# Allegro board BeagleBone_Black_RevC.brd
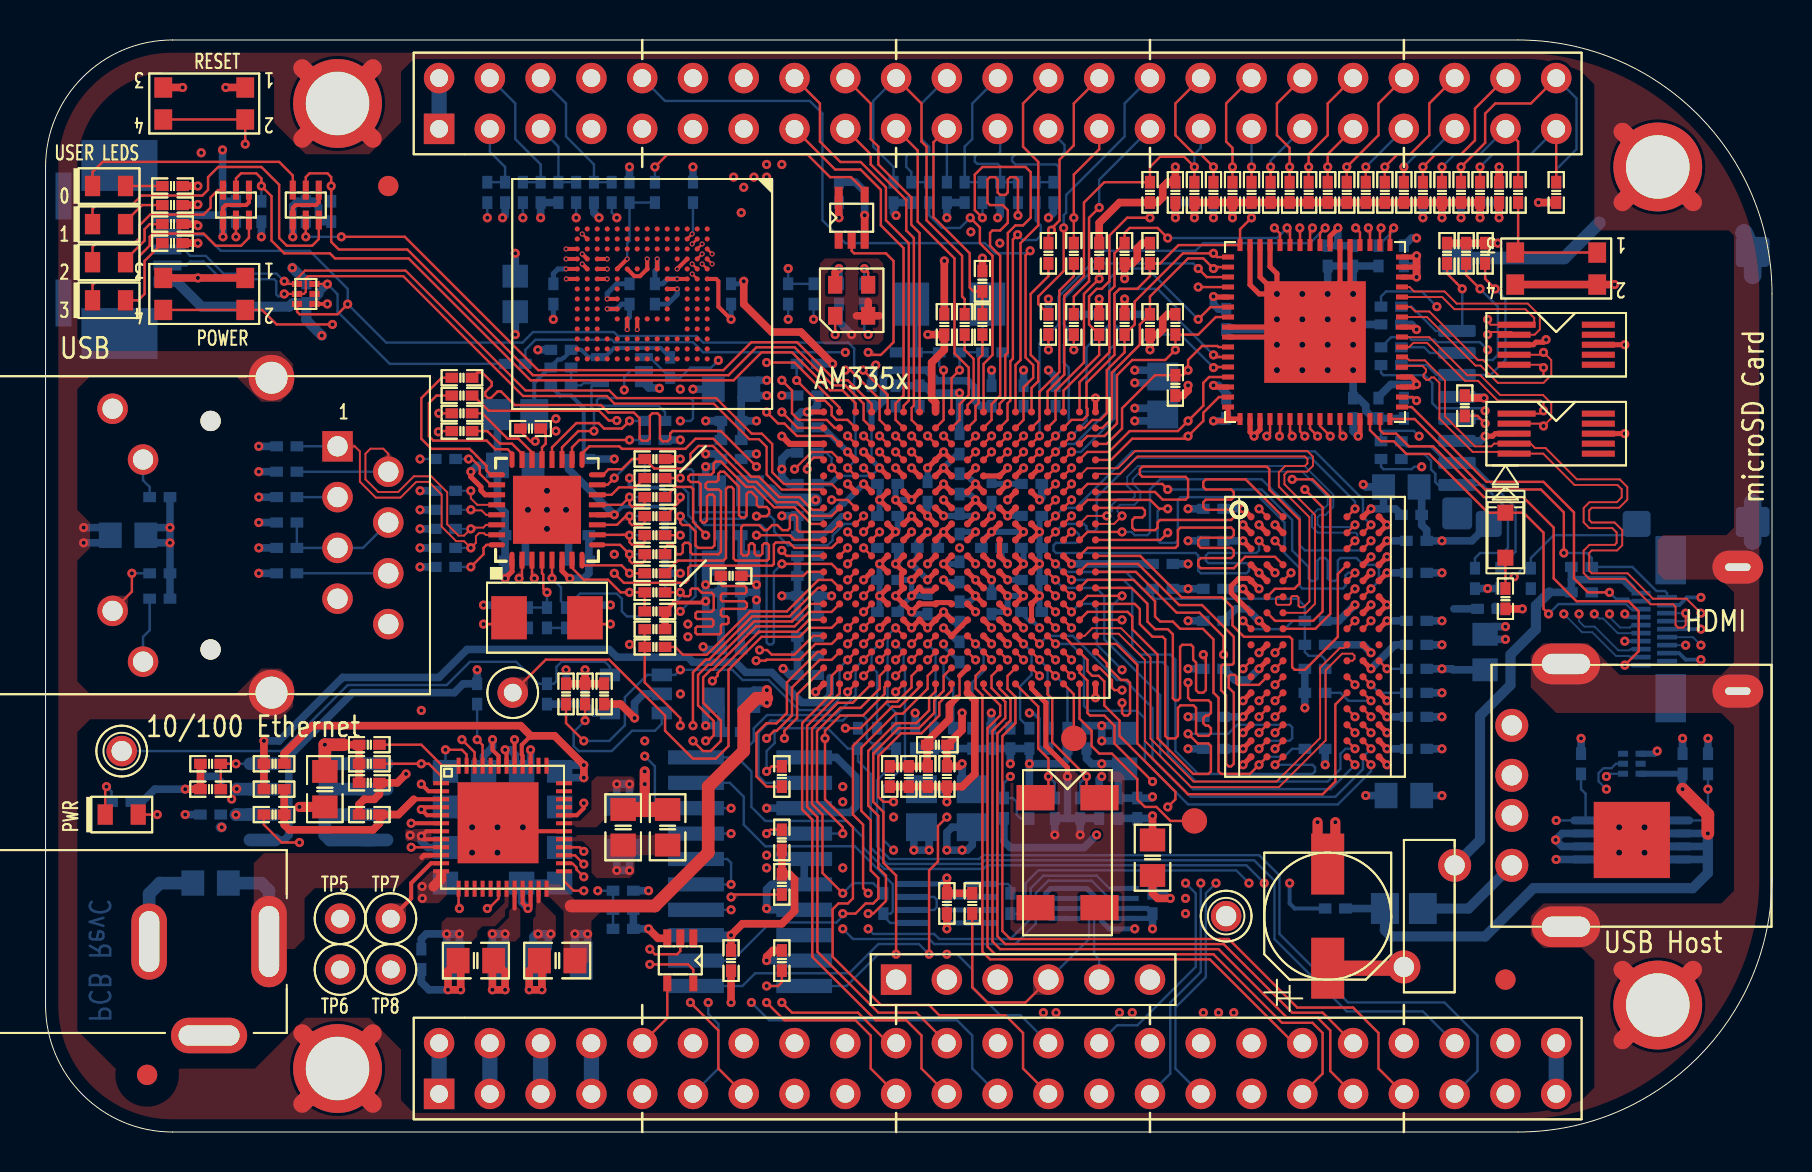
[diagram p0: board, top side]
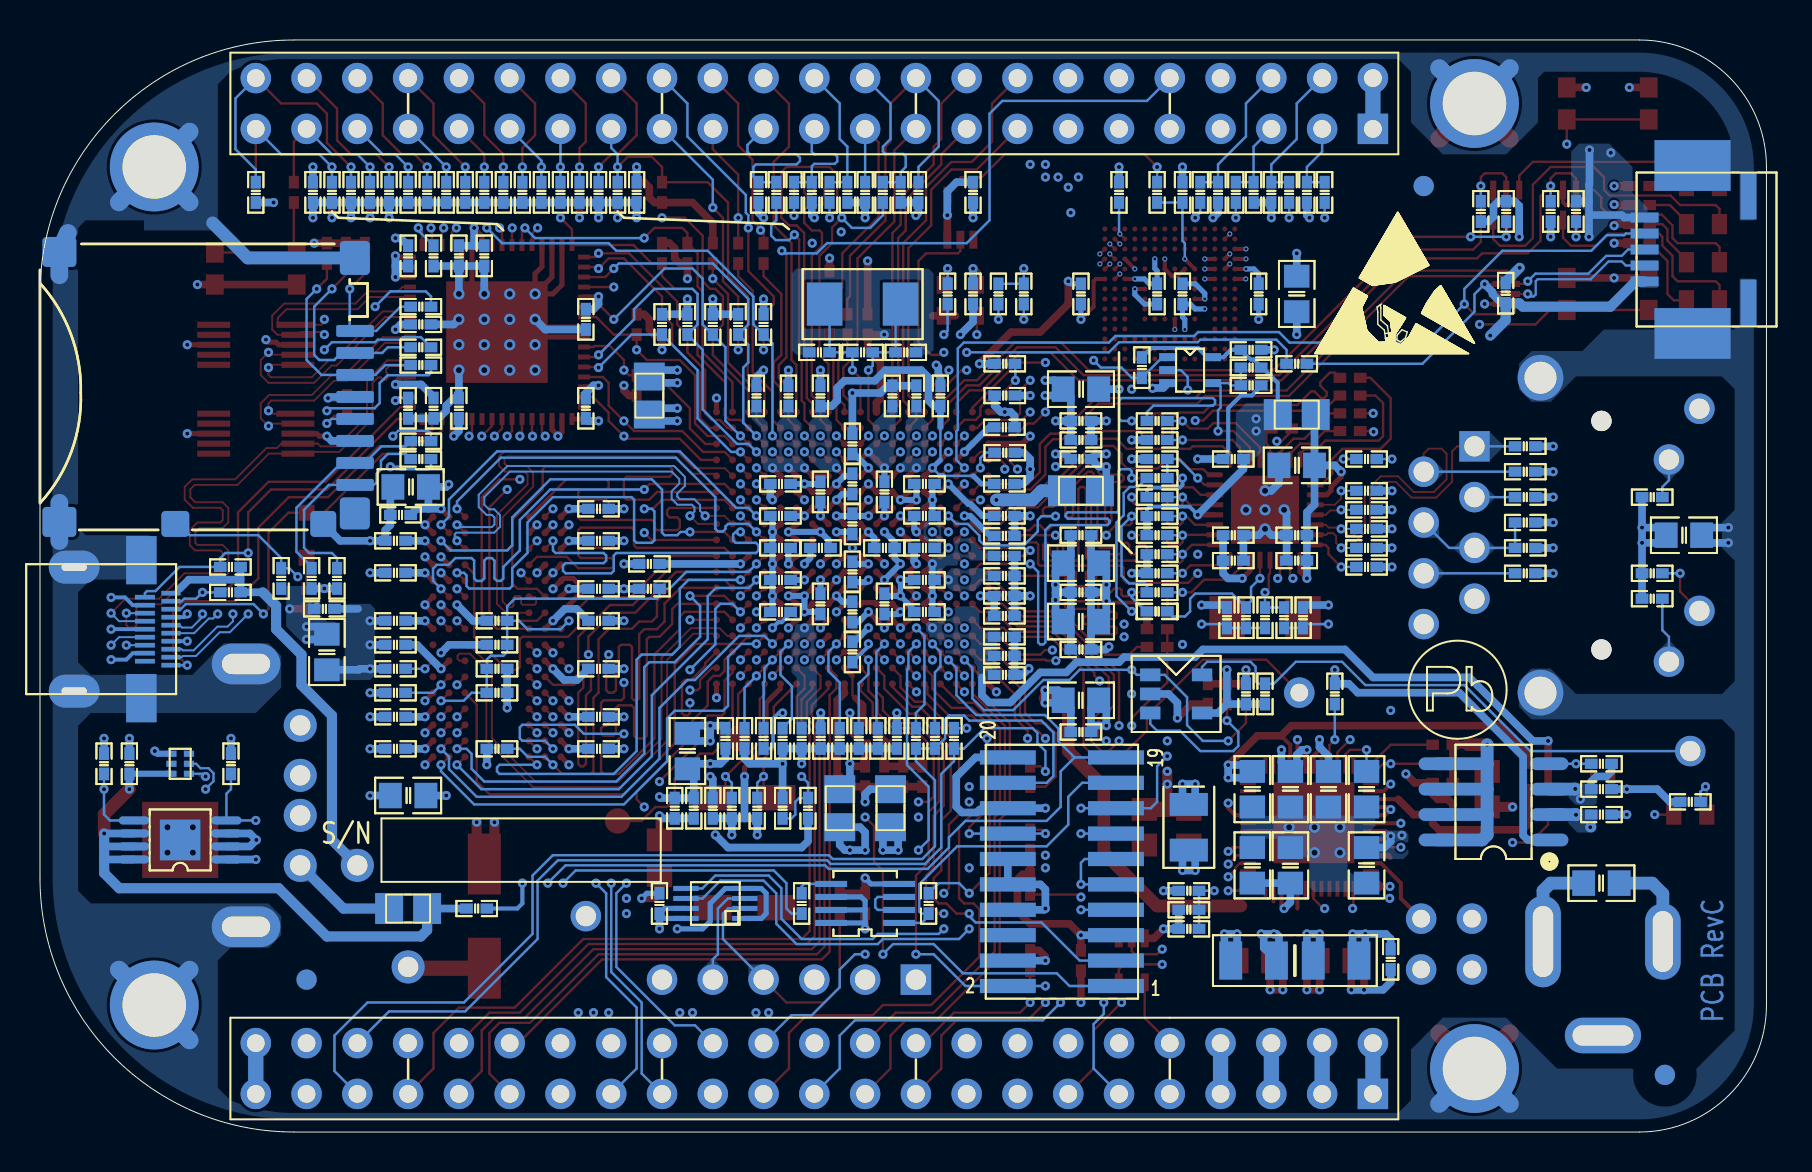
[diagram p1: board, bottom side, seen from below]

Outline 86.36 x 54.61 mm; copper layers: TOP, LYR2_GND, LYR3, LYR4, LYR5_PWR, BOTTOM. Coordinates in mm from the lower left corner of the outline.
Outline path: 0,48.26 0,6.35 arc(1.86,1.86) 6.35,0 73.66,0 arc(82.64,3.72) 86.36,12.7 86.36,41.91 arc(82.64,50.89) 73.66,54.61 6.35,54.61 arc(1.86,52.75) 0,48.26

## Design rules (mm)
constraint set DEFAULT: min track width 0.121
net group HDMI_TX0: nets HDMI_TX0+ HDMI_TX0-
net group HDMI_TX1: nets HDMI_TX1+ HDMI_TX1-
net group HDMI_TX2: nets HDMI_TX2+ HDMI_TX2-
net group HDMI_TXC: nets HDMI_TXC+ HDMI_TXC-
net group MMC1_CLK: nets AM3_MMC1_CLK MMC1_CLK
net group MMC1_DAT0: nets AM3_MMC1_DAT0 MMC1_DAT0
net group MMC1_DAT1: nets AM3_MMC1_DAT1 MMC1_DAT1
net group MMC1_DAT2: nets AM3_MMC1_DAT2 MMC1_DAT2
net group MMC1_DAT3: nets AM3_MMC1_DAT3 MMC1_DAT3
net group MMC1_DAT4: nets AM3_MMC1_DAT4 MMC1_DAT4
net group MMC1_DAT5: nets AM3_MMC1_DAT5 MMC1_DAT5
net group MMC1_DAT6: nets AM3_MMC1_DAT6 MMC1_DAT6
net group MMC1_DAT7: nets AM3_MMC1_DAT7 MMC1_DAT7
net group RX: nets RXN RXP
net group TX: nets TXN TXP
net group USB0: nets USB0_DM USB0_DP
net group USB1: nets USB1_DM USB1_DP
net group CLK: nets SD_CLK
net group DDR_ADD: nets DDR_A0 DDR_A1 DDR_A2 DDR_A3 DDR_A4 DDR_A5 DDR_A6 DDR_A7 DDR_A8 DDR_A9 DDR_A10 DDR_A11 DDR_A12 DDR_A13 DDR_A14 DDR_BA0 DDR_BA1 DDR_BA2 DDR_CASN DDR_CKE DDR_CLK DDR_CLKN DDR_CSN DDR_ODT DDR_RASN DDR_WEN
net group DDR_DQ0: nets DDR_D0 DDR_D1 DDR_D2 DDR_D3 DDR_D4 DDR_D5 DDR_D6 DDR_D7 DDR_DQM0 DDR_DQS0 DDR_DQSN0
net group DDR_DQ1: nets DDR_D8 DDR_D9 DDR_D10 DDR_D11 DDR_D12 DDR_D13 DDR_D14 DDR_D15 DDR_DQM1 DDR_DQS1 DDR_DQSN1
nets with their own width: min track width 0.203; nets USB1_VBUS

## Placement (name value [footprint] x y rotation side)
C1  10uF,16V  [805]  13.97 17.14 270 top
C2  10uF,16V  [805]  8.26 12.45 0 bottom
C3  100nF,16V  [402]  16.19 19.37 0 top
C4  10uF,16V  [805]  20 17.14 90 bottom
C5  10pF,50V  [0402]  30.48 25.15 0 top
C7  10uF,16V  [805]  23.81 13.34 270 bottom
C8  10uF,16V  [805]  25.72 13.34 270 bottom
C9  10uF,16V  [805]  21.53 8.57 180 top
C10  10uF,16V  [805]  20 13.34 90 bottom
C11  10uF,16V  [805]  28.89 15.24 270 top
C12  10uF,16V  [805]  25.59 8.57 0 top
C13  10uF,16V  [805]  23.81 17.14 90 bottom
C14  10uF,16V  [805]  25.72 17.14 90 bottom
C15  10uF,16V  [805]  21.91 17.14 90 bottom
C16  2.2uF,10V  [402]  16.19 17.46 180 top
C17  2.2uF,10V  [402]  8.26 15.88 180 bottom
C18  2.2uF,10V  [402]  16.19 18.41 180 top
C19  470pF,50V  [402]  8.26 18.41 180 top
C20  100nF,16V  [402]  8.26 17.14 180 bottom
C21  18pF,50V  [402]  50.48 16.19 90 bottom
C22  18pF,50V  [402]  51.75 16.19 90 bottom
C23  100nF,16V  [0402]  25.78 39.12 180 bottom
C24  2.2uF,10V  [402]  28.89 11.11 0 bottom
C25  18pF,50V  [402]  47.37 38.99 0 bottom
C26  18pF,50V  [402]  43.05 38.99 180 bottom
C27  100nF,16V  [402]  45.09 11.43 90 top
C28  100nF,16V  [402]  55.88 27.17 0 bottom
C29  100nF,16V  [402]  34.29 8.57 270 top
C30  100nF,16V  [402]  28.89 10.16 0 bottom
C31  100nF,16V  [402]  43.18 17.78 270 top
C32  1nF,50V  [402]  42.23 17.78 270 top
C33  100nF,16V  [402]  44.13 17.78 270 top
C34  100uF,10V  [RD205SMD_250D]  64.14 10.79 90 top
C35  100nF,16V  [402]  81.89 18.41 90 bottom
C36  100nF,16V  [402]  13.04 41.95 90 bottom
C37  100nF,16V  [402]  27.94 21.91 270 top
C38  100nF,16V  [402]  34.29 34.61 180 bottom
C39  10uF,16V  [805]  34.29 25.53 0 bottom
C40  10uF,16V  [805]  34.29 28.45 0 bottom
C41  100nF,16V  [402]  42.12 32.41 180 bottom
C42  100nF,16V  [402]  45.72 32.41 270 bottom
C43  100nF,16V  [402]  47.32 32.01 90 bottom
C44  100nF,16V  [402]  38.12 25.81 180 bottom
C45  100nF,16V  [402]  38.12 29.81 180 bottom
C46  100nF,16V  [402]  44.12 29.21 0 bottom
C47  100nF,16V  [402]  45.72 30.41 270 bottom
C48  100nF,16V  [402]  47.32 29.21 0 bottom
C49  100nF,16V  [402]  45.72 28.01 90 bottom
C50  100nF,16V  [402]  47.32 26.41 90 bottom
C51  100nF,16V  [402]  34.29 29.84 180 bottom
C52  100nF,16V  [402]  34.29 26.99 180 bottom
C53  100nF,16V  [402]  34.29 24.13 180 bottom
C54  100nF,16V  [402]  38.12 26.81 180 bottom
C55  10uF,16V  [805]  31.11 15.24 270 top
C56  100nF,16V  [402]  45.72 34.41 270 bottom
C57  100nF,16V  [402]  56.52 46.99 270 top
C58  100nF,16V  [402]  42.52 36.81 90 bottom
C59  100nF,16V  [402]  43.5 19.68 270 bottom
C60  100nF,16V  [402]  42.12 27.61 180 bottom
C61  100nF,16V  [402]  72.71 46.99 270 top
C62  10uF,16V  [805]  34.29 21.59 0 bottom
C63  100nF,16V  [402]  44.12 26.41 90 bottom
C64  100nF,16V  [402]  34.29 20 180 bottom
C65  100nF,16V  [402]  42.12 29.21 180 bottom
C66  100nF,16V  [402]  42.12 30.81 180 bottom
C67  100nF,16V  [402]  34.29 35.56 180 bottom
C68  100nF,16V  [402]  48.92 36.81 270 bottom
C69  100nF,16V  [402]  38.12 28.81 0 bottom
C70  100nF,16V  [402]  42.12 26.01 180 bottom
C71  100nF,16V  [402]  38.1 36.83 180 bottom
C72  100nF,16V  [402]  45.72 26.01 270 bottom
C73  100nF,16V  [402]  49.32 32.41 0 bottom
C74  100nF,16V  [402]  50.52 36.81 270 bottom
C75  100nF,16V  [402]  56.52 46.99 270 bottom
C76  100nF,16V  [402]  72.71 46.99 270 bottom
C77  10uF,16V  [805]  34.29 37.15 180 bottom
C78  100nF,16V  [402]  34.29 33.66 0 bottom
C79  100nF,16V  [402]  38.12 27.81 180 bottom
C80  100nF,16V  [402]  41.32 36.81 90 bottom
C81  100nF,16V  [402]  47.32 36.81 90 bottom
C82  100nF,16V  [402]  38.12 24.77 180 bottom
C83  100nF,16V  [402]  38.12 23.81 180 bottom
C84  100nF,16V  [402]  38.12 32.41 180 bottom
C85  100nF,16V  [402]  38.12 22.86 180 bottom
C86  100nF,16V  [402]  38.12 35.24 180 bottom
C87  100nF,16V  [402]  38.12 30.81 180 bottom
C88  100nF,16V  [402]  45.72 24.01 270 bottom
C89  1uF,10V  [402]  46.35 19.68 270 bottom
C90  1uF,10V  [402]  44.45 19.68 270 bottom
C91  1uF,10V  [402]  45.4 19.68 270 bottom
C92  100nF,16V  [402]  48.26 19.68 270 bottom
C93  100nF,16V  [402]  45.09 17.78 270 top
C94  100nF,16V  [402]  44.12 32.01 270 bottom
C95  10uF,16V  [805]  53.98 19.05 90 bottom
C96  10uF,16V  [805]  55.37 13.72 90 top
C97  100nF,16V  [402]  49.32 30.81 180 bottom
C98  100nF,16V  [402]  49.32 29.21 180 bottom
C99  100nF,16V  [402]  49.32 27.61 180 bottom
C100  100nF,16V  [402]  49.32 26.01 180 bottom
C101  100nF,16V  [402]  52.07 19.68 270 bottom
C102  100nF,16V  [402]  53.66 16.19 90 bottom
C103  100nF,16V  [402]  54.61 16.19 90 bottom
C104  1uF,10V  [402]  49.21 19.68 270 bottom
C105  100nF,16V  [402]  47.31 19.68 270 bottom
C106  1uF,10V  [402]  43.72 36.81 90 bottom
C107  100nF,16V  [402]  58.42 31.17 180 bottom
C108  100nF,16V  [402]  58.42 29.57 180 bottom
C109  100nF,16V  [402]  58.42 27.17 180 bottom
C110  100nF,16V  [402]  58.42 25.57 180 bottom
C111  100nF,16V  [402]  58.42 23.16 180 bottom
C112  100nF,16V  [402]  58.42 20.76 180 bottom
C113  100nF,16V  [402]  58.42 19.16 180 bottom
C114  100nF,16V  [402]  68.33 30.86 0 bottom
C115  100nF,16V  [402]  68.58 29.57 0 bottom
C116  100nF,16V  [402]  68.58 27.97 0 bottom
C117  100nF,16V  [402]  68.58 25.57 0 bottom
C118  10uF,16V  [805]  67.82 32.26 180 bottom
C119  100nF,16V  [402]  68.58 24.36 0 bottom
C120  100nF,16V  [402]  68.58 20.76 0 bottom
C121  100nF,16V  [402]  68.58 19.16 0 bottom
C122  10uF,16V  [805]  67.94 16.83 180 bottom
C123  1nF,50V  [402]  63.5 24.36 0 bottom
C124  100nF,16V  [402]  63.5 21.96 180 bottom
C125  2.2uF,10V  [402]  32.38 46.99 90 bottom
C126  10uF,16V  [805]  23.5 41.91 90 bottom
C127  100nF,16V  [402]  25.4 41.91 270 bottom
C128  100nF,16V  [402]  29.21 41.91 90 bottom
C129  100nF,16V  [402]  30.48 41.91 270 bottom
C130  100nF,16V  [402]  34.29 41.91 270 bottom
C131  100nF,16V  [402]  23.5 28.57 0 bottom
C132  100nF,16V  [402]  23.5 29.84 0 bottom
C133  10uF,16V  [805]  23.5 33.34 180 bottom
C134  1uF,10V  [402]  26.67 28.57 180 bottom
C135  100nF,16V  [402]  26.67 33.66 0 bottom
C136  470pF,50V  [0402]  26.67 29.84 180 bottom
C137  10pF,50V  [402]  12.06 34.29 180 bottom
C138  10pF,50V  [402]  12.06 33.02 180 bottom
C139  10pF,50V  [402]  12.06 31.75 180 bottom
C140  10pF,50V  [402]  12.06 27.94 180 bottom
C141  22nF,50V  [402]  12.06 30.48 180 bottom
C142  33pF,50V  [402]  23.18 25.72 90 bottom
C143  33pF,50V  [402]  26.99 25.72 90 bottom
C144  2.2uF,10V  [402]  59.05 40.64 270 bottom
C145  100nF,16V  [402]  59.05 36.2 270 bottom
C146  2.2uF,10V  [402]  64.14 43.81 270 bottom
C147  100nF,16V  [402]  65.41 36.2 90 bottom
C148  2.2uF,10V  [402]  65.41 43.81 270 bottom
C149  100nF,16V  [402]  67.94 43.81 90 bottom
C150  100nF,16V  [402]  67.31 40.39 180 bottom
C151  2.2uF,10V  [402]  66.67 36.2 270 bottom
C152  100nF,16V  [402]  26.04 21.91 90 bottom
C153  10uF,16V  [805]  72.01 24 270 bottom
C154  100nF,16V  [402]  72.14 26.16 180 bottom
C155  100nF,16V  [402]  55.37 11.43 270 bottom
C156  47pF,50V  [402]  55.24 43.94 90 top
C157  47pF,50V  [402]  53.98 40.39 90 top
C158  100nF,16V  [402]  39.69 46.99 90 bottom
C159  100nF,16V  [402]  39.69 41.91 270 bottom
C160  47pF,50V  [402]  55.24 40.39 270 top
C161  47pF,50V  [402]  51.44 40.39 90 bottom
C162  47pF,50V  [402]  52.7 40.39 90 bottom
C163  47pF,50V  [402]  56.52 40.39 90 top
C164  47pF,50V  [402]  50.16 40.39 90 bottom
C165  47pF,50V  [402]  55.24 46.99 270 top
C166  47pF,50V  [402]  52.7 40.39 90 top
C167  47pF,50V  [402]  53.98 43.94 270 top
C168  47pF,50V  [402]  52.7 43.94 90 top
C169  47pF,50V  [402]  56.52 37.34 270 top
C170  47pF,50V  [402]  53.98 40.39 90 bottom
C171  47pF,50V  [402]  75.56 46.99 270 bottom
C172  47pF,50V  [402]  55.24 40.39 90 bottom
C173  47pF,50V  [402]  75.56 46.99 270 top
C174  4.7uF,10V  [0402]  25.78 37.34 180 bottom
C175  10pF,50V  [0402]  46.86 42.55 90 top
D1  19-217/BHC-ZL1M2RY/3T  [LED_0603]  3.81 15.88 0 top
D2  19-217/BHC-ZL1M2RY/3T  [LED_0603]  3.17 47.31 0 top
D3  19-217/BHC-ZL1M2RY/3T  [LED_0603]  3.17 45.4 0 top
D4  19-217/BHC-ZL1M2RY/3T  [LED_0603]  3.17 43.5 0 top
D5  19-217/BHC-ZL1M2RY/3T  [LED_0603]  3.17 41.59 0 top
D6  TPD4S009DGSR  [TSSOP10]  75.56 34.92 270 top
D7  TPD4S009DGSR  [TSSOP10]  75.56 39.37 270 top
D8  RB751V40,115  [SOD323]  73.03 29.84 90 top
FB1  150R,800mA  [SM-7351-IND-0805]  34.29 32.07 0 bottom
FB2  150R,800mA  [SM-7351-IND-0805]  46.35 16.19 270 bottom
FB3  150R,800mA  [SM-7351-IND-0805]  43.81 16.19 270 bottom
FB4  150R,800mA  [SM-7351-IND-0805]  23.5 35.88 180 bottom
FB5  150R,800mA  [SM-7351-IND-0805]  55.88 36.83 270 bottom
FB7  150R,800mA  [SM-7351-IND-0805]  67.94 11.18 0 bottom
J1  Header 1x6Pin 2.54MM  [SIP6]  42.55 7.62 90 top
L1  2.2uH,1.3A  [2520]  21.53 8.57 180 bottom
L2  2.2uH,1.3A  [2520]  25.65 8.57 0 bottom
L3  2.2uH,1.3A  [2520]  28.89 15.24 270 bottom
MTG1  MHOLE  [MTGH200C125D_PL]  14.61 3.17 90 top
MTG2  MHOLE  [MTGH200C125D_PL]  80.64 6.35 90 top
MTG3  MHOLE  [MTGH200C125D_PL]  14.61 51.44 90 top
MTG4  MHOLE  [MTGH200C125D_PL]  80.64 48.26 90 top
NOREF  -  []  6.35 54.61 0 top
NOREF#2  -  []  14.61 3.17 0 top
NOREF#3  -  []  85.72 28.57 0 top
NOREF#4  -  []  80.64 48.26 0 top
NOREF#5  -  []  0 -11.96 0 top
NOREF#6  -  []  -34.92 -47.62 0 top
NOREF#7  -  [unnamed#2]  5.08 2.86 270 top
NOREF#8  -  []  -368.3 -256.54 0 top
NOREF#9  -  []  80.64 6.35 0 top
NOREF#10  -  []  -368.17 -256.47 0 top
NOREF#11  -  []  -11.96 0 90 top
NOREF#12  -  []  81.92 52.07 0 top
NOREF#13  -  [unnamed#2]  73.03 7.62 270 top
NOREF#14  -  []  80.64 6.35 0 top
NOREF#15  -  []  86.36 27.94 0 top
NOREF#16  -  []  85.72 28.57 0 top
NOREF#17  -  []  86.36 39.69 0 top
NOREF#18  -  []  0 0 0 top
NOREF#19  -  []  86.36 12.7 0 top
NOREF#20  -  []  14.61 3.17 0 top
NOREF#21  -  []  14.61 51.44 0 top
NOREF#22  -  []  0 0 0 top
NOREF#23  -  []  85.72 39.05 0 top
NOREF#24  -  [unnamed#2]  17.14 47.31 270 top
NOREF#25  -  []  319.53 -174.24 0 top
NOREF#26  -  [unnamed#2]  73.03 7.62 270 bottom
NOREF#27  -  [unnamed#2]  17.14 47.31 270 bottom
NOREF#28  -  []  1.91 53.34 180 bottom
NOREF#29  -  [unnamed#2]  5.08 2.86 270 bottom
P1  DC630-20D01  [CONN3-PWR-PJ102A]  11.18 9.53 180 top
P2  Heaader 2x10 1.27mm  [HEADER10X2_SMD]  35.24 13.02 90 bottom
P3  UB11123-4H9-4F  [USB_A_SH]  73.34 13.34 90 top
P4  UX60SC-MB-5ST(80)  [USB5MINI_4SHIELDED_SMD-5]  6.1 44.13 0 bottom
P5  LPJ0011BBNL  [RJ45-7499010211A]  14.61 34.29 270 top
P6  10118241-001RLF  [CONN19_HDMI]  84.65 25.15 270 bottom
P8  Female Header 2x23Pin 2.54MM  [HEADER23X2]  19.68 50.16 0 top
P9  Female Header 2x23Pin 2.54MM  [HEADER23X2]  19.68 1.91 0 top
P10  YL004-030-001  [MICRO_SD_15X14_3X1_8MM]  70.61 31.26 90 bottom
Q1  DDC114YU-7-F  [SMINI6-F3-B]  13.02 46.35 180 top
Q2  DDC114YU-7-F  [SMINI6-F3-B]  9.53 46.35 180 top
R1  100K,1%  [402]  21.59 21.91 270 bottom
R2  33R,5%  [0402]  67.31 41.27 0 bottom
R3  1.5K,1%  [402]  26.04 21.91 270 top
R4  1.5K,1%  [402]  26.99 21.91 270 top
R5  0R,5%  [402]  16.19 15.88 180 top
R6  0R,5%  [402]  18.8 8.64 270 bottom
R7  0R,5%  [402]  11.43 15.88 180 top
R8  0R,5%  [402]  11.43 17.14 180 top
R9  0R,5%  [402]  11.43 18.41 0 top
R10  470K,1%  [402]  8.26 17.14 180 top
R11  280K,1%  [402]  8.26 18.41 0 bottom
R12  470R,5%  [402]  3.81 16.51 180 bottom
R13  33R,5%  [0402]  67.31 39.24 0 bottom
R14  10K,1%  [402]  28.89 12.06 180 bottom
R15  33R,5%  [0402]  67.31 38.35 0 bottom
R16  33R,5%  [0402]  30.48 24.26 180 top
R17  1M,1%  [402]  45.21 38.99 180 bottom
R18  33R,5%  [0402]  41.91 11.43 270 bottom
R19  0R,5%  [402]  41.59 19.68 270 bottom
R20  0R,5%  [402]  42.55 19.68 90 bottom
R21  33R,5%  [0402]  48.26 11.43 270 bottom
R22  49.9R,1%  [402]  55.88 28.41 180 bottom
R23  4.7K,1%  [402]  36.83 12.38 270 top
R24  4.7K,1%  [402]  36.83 14.61 90 top
R25  4.7K,1%  [402]  36.83 8.57 90 top
R26  4.7K,1%  [402]  50.16 19.68 90 bottom
R27  0R,5%  [402]  44.61 19.37 180 top
R28  33R,5%  [0402]  34.29 27.81 180 top
R29  0R,5%  [402]  44.96 40.39 90 top
R30  0R,5%  [402]  52.7 16.19 270 bottom
R31  33R,5%  [0402]  67.31 34.54 0 bottom
R32  33R,5%  [0402]  67.31 33.66 0 bottom
R33  10K,1%  [0402]  25.78 38.23 0 bottom
R34  10K,1%  [0402]  31.24 38.23 270 bottom
R35  33R,5%  [0402]  46.86 40.39 90 top
R36  33R,5%  [0402]  45.97 40.39 90 top
R37  0R,5%  [0402]  64.52 11.18 0 bottom
R38  33R,5%  [0402]  24.26 35.18 0 top
R39  33R,5%  [0402]  20.83 35.94 0 top
R40  33R,5%  [0402]  20.83 35.05 0 top
R41  33R,5%  [0402]  20.83 36.83 180 top
R42  33R,5%  [0402]  20.83 37.72 180 top
R43  33R,5%  [0402]  49.53 46.99 90 bottom
R44  33R,5%  [0402]  46.86 46.99 90 bottom
R45  22R,1%  [0402]  50.16 43.94 90 top
R46  0R,5%  [0402]  51.44 43.94 90 top
R47  0R,5%  [0402]  51.44 40.39 90 top
R48  0R,5%  [0402]  50.16 40.39 90 top
R49  0R,5%  [402]  38.1 33.97 0 bottom
R50  0R,5%  [402]  36.83 17.78 270 top
R51  0R,5%  [402]  40.64 19.68 90 bottom
R52  10K,1%  [402]  83.16 18.41 270 bottom
R53  10K,1%  [402]  76.81 18.41 90 bottom
R54  10K,1%  [402]  51.12 19.68 90 bottom
R55  100K,1%  [402]  58.42 46.99 90 bottom
R56  100K,1%  [402]  57.47 46.99 90 bottom
R57  100K,1%  [402]  60.33 46.99 90 bottom
R58  100K,1%  [402]  61.28 46.99 90 bottom
R59  100K,1%  [402]  59.37 46.99 90 bottom
R60  100K,1%  [402]  62.23 46.99 90 bottom
R61  100K,1%  [402]  63.18 46.99 90 bottom
R62  100K,1%  [402]  64.14 46.99 90 bottom
R63  100K,1%  [402]  65.09 46.99 90 bottom
R64  100K,1%  [402]  66.04 46.99 90 bottom
R65  100K,1%  [402]  66.99 46.99 90 bottom
R66  100K,1%  [402]  67.94 46.99 90 bottom
R67  100K,1%  [402]  68.9 46.99 90 bottom
R68  100K,1%  [402]  69.85 46.99 90 bottom
R69  100K,1%  [402]  70.8 46.99 90 bottom
R70  100K,1%  [402]  71.75 46.99 90 bottom
R71  2.2K,5%  [402]  6.35 44.45 180 top
R72  2.2K,5%  [402]  6.35 47.31 180 top
R73  2.2K,5%  [402]  6.35 46.35 180 top
R74  2.2K,5%  [402]  6.35 45.4 180 top
R75  100R,1%  [402]  73.66 46.99 270 top
R76  100K,1%  [402]  13.02 46.04 90 bottom
R77  100K,1%  [402]  14.29 46.04 270 bottom
R78  100K,1%  [402]  9.53 46.04 90 bottom
R79  100K,1%  [402]  10.79 46.04 270 bottom
R80  100K,1%  [402]  58.42 46.99 270 top
R81  100K,1%  [402]  57.47 46.99 270 top
R82  100K,1%  [402]  60.33 46.99 270 top
R83  100K,1%  [402]  61.28 46.99 270 top
R84  100K,1%  [402]  59.37 46.99 270 top
R85  100K,1%  [402]  62.23 46.99 270 top
R86  100K,1%  [402]  63.18 46.99 270 top
R87  100K,1%  [402]  64.14 46.99 270 top
R88  100K,1%  [402]  65.09 46.99 270 top
R89  100K,1%  [402]  66.04 46.99 270 top
R90  100K,1%  [402]  66.99 46.99 270 top
R91  100K,1%  [402]  67.94 46.99 270 top
R92  100K,1%  [402]  68.9 46.99 270 top
R93  100K,1%  [402]  69.85 46.99 270 top
R94  100K,1%  [402]  70.8 46.99 270 top
R95  100K,1%  [402]  71.75 46.99 270 top
R96  10K,1%  [402]  68.58 23.16 180 bottom
R97  1.5K,1%  [402]  63.5 19.16 180 bottom
R98  10K,1%  [402]  63.5 25.57 180 bottom
R99  240R,1%  [0402]  68.58 21.96 180 bottom
R100  10K,1%  [402]  63.5 23.16 180 bottom
R101  10K,1%  [402]  50.42 46.99 90 bottom
R102  10K,1%  [402]  45.97 46.99 90 bottom
R103  10K,1%  [402]  25.65 46.99 90 bottom
R104  10K,1%  [402]  27.43 46.99 90 bottom
R105  10K,1%  [402]  47.75 46.99 90 bottom
R106  10K,1%  [402]  43.31 46.99 90 bottom
R107  10K,1%  [402]  22.99 46.99 90 bottom
R108  10K,1%  [402]  24.77 46.99 90 bottom
R109  10K,1%  [402]  42.42 46.99 90 bottom
R110  10K,1%  [402]  45.09 46.99 90 bottom
R111  10K,1%  [402]  29.21 46.99 270 bottom
R112  1.5K,1%  [402]  30.48 30.8 0 bottom
R113  1.5K,1%  [402]  30.48 33.66 0 bottom
R114  1.5K,1%  [402]  30.48 29.84 0 bottom
R115  10K,1%  [402]  30.48 31.75 0 bottom
R116  10K,1%  [402]  30.48 27.94 0 bottom
R117  10K,1%  [402]  30.48 28.89 0 bottom
R118  10K,1%  [402]  30.48 26.04 0 top
R119  1.5K,1%  [402]  30.48 33.66 180 top
R120  49.9R,1%  [402]  20 29.21 180 bottom
R121  49.9R,1%  [402]  20 30.16 180 bottom
R122  49.9R,1%  [402]  20 31.11 180 bottom
R123  49.9R,1%  [402]  20 32.07 180 bottom
R124  10R,1%  [402]  30.48 26.99 180 top
R125  100R,1%  [402]  30.48 27.94 180 top
R126  100R,1%  [402]  30.48 28.89 180 top
R127  100R,1%  [402]  30.48 29.84 180 top
R128  100R,1%  [402]  30.48 30.8 180 top
R129  100R,1%  [402]  20 33.66 0 bottom
R130  470R,5%  [402]  5.71 27.94 180 bottom
R131  100R,1%  [402]  30.48 26.99 180 bottom
R132  470R,5%  [402]  5.71 31.75 180 bottom
R133  100R,1%  [402]  30.48 31.75 180 top
R134  100R,1%  [402]  30.48 35.56 180 bottom
R135  10K,1%  [402]  5.71 26.67 0 bottom
R136  0.1R,5%  [805]  4.13 29.84 180 bottom
R137  0R,5%  [402]  12.06 29.21 180 bottom
R138  100R,1%  [402]  30.48 32.7 180 bottom
R139  100R,1%  [402]  30.48 32.7 180 top
R140  0R,5%  [402]  30.48 26.04 180 bottom
R141  1M,1%  [402]  25.08 25.72 270 bottom
R142  0R,5%  [402]  26.04 25.72 90 bottom
R143  10R,1%  [402]  24.13 25.72 270 bottom
R144  12.1K,1%  [402]  20 28.26 180 bottom
R145  10K,1%  [402]  30.48 34.61 0 bottom
R146  1.5K,1%  [402]  76.83 26.99 0 bottom
R147  1.5K,1%  [402]  76.83 28.26 0 bottom
R148  10K,1%  [402]  67.94 36.2 270 bottom
R149  0R,5%  [402]  66.67 43.81 270 bottom
R150  10K,1%  [402]  70.1 43.94 270 top
R151  10K,1%  [402]  72.01 43.94 270 top
R152  10K,1%  [402]  70.99 36.32 270 top
R153  10K,1%  [402]  72.77 27.69 90 bottom
R154  10K,1%  [402]  71.5 27.69 90 bottom
R155  10K,1%  [402]  71.06 43.94 270 top
R156  10K,1%  [402]  25.08 21.91 90 bottom
R157  10K,1%  [402]  74.3 27.69 270 bottom
R158  10K,1%  [402]  38.1 38.42 180 bottom
R159  0R,5%  [402]  23.5 38.42 0 bottom
R160  0R,5%  [402]  38.42 41.91 90 bottom
R161  0R,5%  [402]  37.15 41.91 90 bottom
R162  0R,5%  [402]  30.48 46.99 270 bottom
R163  4.7K,1%  [402]  47.94 16.19 90 bottom
R164  4.7K,1%  [402]  49.21 16.19 90 bottom
R165  100K,1%  [402]  46.35 11.43 90 top
R166  27K,1%  [402]  73.03 26.67 270 top
R167  33R,5%  [0402]  40.96 41.91 270 bottom
R168  33R,5%  [0402]  26.54 46.99 90 bottom
R169  33R,5%  [0402]  28.32 46.99 90 bottom
R170  33R,5%  [0402]  48.64 46.99 90 bottom
R171  33R,5%  [0402]  44.2 46.99 90 bottom
R172  33R,5%  [0402]  22.1 46.99 90 bottom
R173  33R,5%  [0402]  23.88 46.99 90 bottom
RT1  RXEF010  [POLYSW200-5638-310]  70.48 13.34 90 top
S1  KMR231GLFS  [SW4SMD_63X161LS]  7.94 51.44 180 top
S2  KMR231GLFS  [SW4SMD_63X161LS]  75.56 43.18 180 top
S3  KMR231GLFS  [SW4SMD_63X161LS]  7.94 41.91 180 top
TP1  Test Point  [TP1-8040]  59.05 10.79 0 top
TP2  Test Point  [TP60C_SMD]  57.47 15.56 0 top
TP3  Test Point  [TP60C_SMD]  51.44 19.68 0 top
TP4  Test Point  [TP1-8040]  3.81 19.05 0 top
TP5  Test Point  [TP60C33D]  14.73 10.67 0 top
TP6  Test Point  [TP60C33D]  14.73 8.13 0 top
TP7  Test Point  [TP60C33D]  17.27 10.67 0 top
TP8  Test Point  [TP60C33D]  17.27 8.13 0 top
TP9  Test Point  [TP60C33D]  23.37 21.97 0 top
U1  SN74AHC1G09DCKR  [DCK5_2P15X1P4]  28.83 38.1 270 bottom
U2  TPS65217CRSLR  [U_48_RSL]  22.86 15.24 0 top
U3  SN74LVC1G06DCKR  [DCK5_2P15X1P4]  40.32 45.72 0 top
U4  TL5209DR  [SO8-25X75]  13.65 16.51 90 bottom
U5  AM3358BZCZ100  [AM33XX_15X15]  45.72 29.21 180 top
U6  SN74LVC1G74DCTR  [SOP8_DCT]  45.09 11.43 90 bottom
U7  24LC32AT-I/OT  [SOT23-5]  29.53 21.91 270 bottom
U8  TPS2051BDGNR  [DGN-16X60]  79.35 14.61 90 bottom
U9  TPD4S012DRYR  [U_6_DRY]  79.35 18.41 90 bottom
U10  TPD4S012DRYR  [U_6_DRY]  13.02 41.91 270 top
U11  TDA19988BHN/C1,557  [QFN64S9X9P5]  63.5 40.01 0 top
U12  D2516ECMDXGJD-U  [BGA96_T9_P8_9X14]  63.5 24.77 0 top
U13  EMMC04G-M627  [BGA153_P14_P5_11P5X13]  29.84 41.91 270 top
U14  LAN8710A-EZC-TR  [QFN32_5X5MM_EP3P3MM]  25.08 31.11 0 top
U15  SN74LVC2G241DCUR  [U_8_DCU]  52.58 11.43 90 bottom
U16  SN74LVC1G07DCKR  [DCK5_2P15X1P4]  31.75 8.59 180 top
Y1  32.768KHz,12.5pF  [XTAL4_126-216SMD]  51.12 13.97 270 top
Y2  24MHz,20pF  [XTAL150SMD_125X196]  45.21 41.4 0 bottom
Y3  25MHz,20pF  [XTAL150SMD_125X196]  25.08 25.72 180 top
Y4  24.576MHz  [OSC4_61X65LS_79X98SMD]  40.32 41.59 0 top

## Library data of the parts
C1 C2 C4 C7-C15 C39 C40 C55 C62 C77 C95 C96 C118 C122 C126 C133 C153 = CAP_10uF_Y5V_10V_10%_0805
C3 C20 C23 C27-C31 C33 C35-C38 C41-C54 C56-C61 C63-C76 C78-C88 C92-C94 C97-C103 C105 C107-C117 C119-C121 C124 C127-C132 C135 C145 C147 C149 C150 C152 C154-C173 = CAP_0.1uF_X5R_6.3V_20% 0201
C5 C175 = CC
C16-C18 C125 C144 C146 C148 C151 = CAP_2.2uF_X5R_6.3V_10%_0402
C19 = CAP_470PF_X7R_25V_10%_0402
C21 C22 C25 C26 = CAP_18PF_COG_50V_5%_0402
C24 C89-C91 C104 C106 C134 = CAP_1.0UF_X5R_10V_10%_0402
C32 C123 = CAP_0.001_X7R_50V_5%_0402
C34 = CAP_100UF_TANT_6.3V_3528-21
C136 = 470pF/5%/50V/C0G/0603_0
C137-C140 = CAP_0402_100pF_COG_50V
C141 = CAP_0402_0.1uf_X5R_10V
C142 C143 C174 = CAP_30PF_COG_50V_5%_0402
D1-D5 = LED_LTST-C150GKT_0
D6 D7 = 32CTQ030/TO_1
D8 = DIO_SR305_TH_0
FB1-FB4 FB7 = FER_180_200_0
FB5 = FER_180_200_0805
J1 = HEADER 6: User Part Number: ***
L1-L3 = IND_2.2uH_2.6A_10%_SMD
MTG1-MTG4 = MHOLE
P1 = Power_Jack: Tolerance: X; User Part Number: X
P2 = HDR_10x2_CJTAG_0
P3 = CONN_54819-0578_2: User Part Number: PART#; Tolerance: TOL
P4 = MINI-USB-AB-SOCKET
P5 = CONN_RJ45_MAG_WE_0
P6 = CONN_HDMI_TYPED: User Part Number: PRT#; Tolerance: TOL*
P8 P9 = HDR_46_F_2_0.1_0.1
P10 = MicroSD Card_10+4P
Q1 Q2 = RN1907
R1 R37 R55-R70 R75-R95 R165 = RES_100K_1/16W_1%_0402
R2 R13 R15 R16 R28 R31 R32 R36 R45 R46 R48 R167 = RES_33_0402
R3 R4 R119 R146 R147 = RES_1.5K_1/16W_5%_0402
R5-R9 R23-R26 R50 R51 R112-R118 R159-R164 = RES_4.75K_1/16W_1%_0402
R10 R12 R71-R74 R130 R132 = RES_470_1/10W_5%_0402
R11 = RES_470_1/10W_5%_0402: signal model: 33OHMRESISTOR1_16W5_0402_SM_735_33
R14 = RES_10K_1/16W_1%_0402: signal model: 33OHMRESISTOR1_16W5_0402_SM_735_33
R17 = RES_1M_1/16W_1%_0402: signal model: 33OHMRESISTOR1_16W5_0402_SM_735_33
R18 R21 R47 = RES_33_0402: signal model: 33OHMRESISTOR1_16W5_0402_SM_735_33
R19 R27 R29 R30 R140 R142 R149 R156 = RES_0_1/16W_1%_0402
R20 = RES_0_1/16W_1%_0402: signal model: 33OHMRESISTOR1_16W5_0402_SM_735_33
R22 R38-R42 R120-R123 = RES_4.7K_0402
R33 R34 R52-R54 R96-R98 R100-R111 R135 R137 R143 R145 R148 R150-R155 R157 R158 = RES_10K_1/16W_1%_0402
R35 R43 R44 R168-R173 = RES_33_0402: signal model: RES_33_0402_0402_33R_5%_33R_5%
R49 = RES_100K_1/16W_1%_0402: signal model: 33OHMRESISTOR1_16W5_0402_SM_735_33
R99 = Res
R124-R126 R129 R134 R138 = 100-1/10W-1%-0603_4
R127 R128 R131 R133 R139 = RES_100_1/10W_5%_0402
R136 = RES_0.1_0805
R141 = RES_1M_1/16W_1%_0402
R144 = RES_12.1K_1/16W_1%_0402
R166 = RES_22.6K_1/16W_1%_0402
RT1 = PTC_RXEF010: User Part Number: X; Tolerance: X
S1 S3 = SW_KT11P2JM_2
S2 = SW_KT11P2JM_1
TP1-TP9 = TESTPT1
U1 = SN74AHC1G09DCKR
U2 = PWR_TPS65217_2
U3 = IC_SN74LVC1G06DCK_0
U4 = PWR_TLV70233DBV_0: Tolerance: X; User Part Number: X
U5 = IC_AM335X_ZCZ
U6 = IC_SN74AUC1G74
U7 = MEM_24LC32_SOT23-5
U8 = TPS2061_1: User Part Number: X; Tolerance: X
U9 U10 = PROT_TPD4S012
U11 = IC_TDA19988_HVQFN64_5
U12 = MT47H256M8_7
U13 = eMMC_153-ball_WFBGA
U14 = LAN8710 QFN32_1
U15 = IC_SN74LVC2G241_1
U16 = IC_SN74LVC1G07DCK
Y1 = CRYS_32_768KHz_SMD32_1
Y2 = CRYS_24MHz_SCC_0
Y3 = Suntsu ITEMP 25MHz _0.005% 20pf
Y4 = OSC_12MHz_1.3V: Tolerance: TOL*; User Part Number: P/N*

## Footprints (pads in the part's own frame, mm; a bottom-side part is the same pattern mirrored in y, then rotated)
402
  rect 0.635x0.508 smd: 1(-0.508,0) 2(0.508,0)
0402
  rect 0.635x0.508 smd: 1(-0.508,0) 2(0.508,0)
805
  rect 1.143x1.27 smd: 1(-0.889,0) 2(0.889,0)
2520
  rect 1.143x1.905 smd: 1(-1.143,0) 2(1.143,0)
AM33XX_15X15
  round 0.356 smd: A1(-6.8,6.8) A2(-6,6.8) A3(-5.2,6.8) A4(-4.4,6.8) A5(-3.6,6.8) A6(-2.8,6.8) A7(-2,6.8) A8(-1.2,6.8) A9(-0.4,6.8) A10(0.4,6.8) A11(1.2,6.8) A12(2,6.8) A13(2.8,6.8) A14(3.6,6.8) A15(4.4,6.8) A16(5.2,6.8) A17(6,6.8) A18(6.8,6.8) B1(-6.8,6) B2(-6,6) B3(-5.2,6) B4(-4.4,6) B5(-3.6,6) B6(-2.8,6) B7(-2,6) B8(-1.2,6) B9(-0.4,6) B10(0.4,6) B11(1.2,6) B12(2,6) B13(2.8,6) B14(3.6,6) B15(4.4,6) B16(5.2,6) B17(6,6) B18(6.8,6) C1(-6.8,5.2) C2(-6,5.2) C3(-5.2,5.2) C4(-4.4,5.2) C5(-3.6,5.2) C6(-2.8,5.2) C7(-2,5.2) C8(-1.2,5.2) C9(-0.4,5.2) C10(0.4,5.2) C11(1.2,5.2) C12(2,5.2) C13(2.8,5.2) C14(3.6,5.2) C15(4.4,5.2) C16(5.2,5.2) C17(6,5.2) C18(6.8,5.2) D1(-6.8,4.4) D2(-6,4.4) D3(-5.2,4.4) D4(-4.4,4.4) D5(-3.6,4.4) D6(-2.8,4.4) D7(-2,4.4) D8(-1.2,4.4) D9(-0.4,4.4) D10(0.4,4.4) D11(1.2,4.4) D12(2,4.4) D13(2.8,4.4) D14(3.6,4.4) D15(4.4,4.4) D16(5.2,4.4) D17(6,4.4) D18(6.8,4.4) E1(-6.8,3.6) E2(-6,3.6) E3(-5.2,3.6) E4(-4.4,3.6) E5(-3.6,3.6) E6(-2.8,3.6) E7(-2,3.6) E8(-1.2,3.6) E9(-0.4,3.6) E10(0.4,3.6) E11(1.2,3.6) E12(2,3.6) E13(2.8,3.6) E14(3.6,3.6) E15(4.4,3.6) E16(5.2,3.6) E17(6,3.6) E18(6.8,3.6) F1(-6.8,2.8) F2(-6,2.8) F3(-5.2,2.8) F4(-4.4,2.8) F5(-3.6,2.8) F6(-2.8,2.8) F7(-2,2.8) F8(-1.2,2.8) F9(-0.4,2.8) F10(0.4,2.8) F11(1.2,2.8) F12(2,2.8) F13(2.8,2.8) F14(3.6,2.8) F15(4.4,2.8) F16(5.2,2.8) F17(6,2.8) F18(6.8,2.8) G1(-6.8,2) G2(-6,2) G3(-5.2,2) G4(-4.4,2) G5(-3.6,2) G6(-2.8,2) G7(-2,2) G8(-1.2,2) G9(-0.4,2) G10(0.4,2) G11(1.2,2) G12(2,2) G13(2.8,2) G14(3.6,2) G15(4.4,2) G16(5.2,2) G17(6,2) G18(6.8,2) H1(-6.8,1.2) H2(-6,1.2) H3(-5.2,1.2) H4(-4.4,1.2) H5(-3.6,1.2) H6(-2.8,1.2) H7(-2,1.2) H8(-1.2,1.2) H9(-0.4,1.2) H10(0.4,1.2) H11(1.2,1.2) H12(2,1.2) H13(2.8,1.2) H14(3.6,1.2) H15(4.4,1.2) H16(5.2,1.2) H17(6,1.2) H18(6.8,1.2) J1(-6.8,0.4) J2(-6,0.4) J3(-5.2,0.4) J4(-4.4,0.4) J5(-3.6,0.4) J6(-2.8,0.4) J7(-2,0.4) J8(-1.2,0.4) J9(-0.4,0.4) J10(0.4,0.4) J11(1.2,0.4) J12(2,0.4) J13(2.8,0.4) J14(3.6,0.4) J15(4.4,0.4) J16(5.2,0.4) J17(6,0.4) J18(6.8,0.4) K1(-6.8,-0.4) K2(-6,-0.4) K3(-5.2,-0.4) K4(-4.4,-0.4) K5(-3.6,-0.4) K6(-2.8,-0.4) K7(-2,-0.4) K8(-1.2,-0.4) K9(-0.4,-0.4) K10(0.4,-0.4) K11(1.2,-0.4) K12(2,-0.4) K13(2.8,-0.4) K14(3.6,-0.4) K15(4.4,-0.4) K16(5.2,-0.4) K17(6,-0.4) K18(6.8,-0.4) L1(-6.8,-1.2) L2(-6,-1.2) L3(-5.2,-1.2) L4(-4.4,-1.2) L5(-3.6,-1.2) L6(-2.8,-1.2) L7(-2,-1.2) L8(-1.2,-1.2) L9(-0.4,-1.2) L10(0.4,-1.2) L11(1.2,-1.2) L12(2,-1.2) L13(2.8,-1.2) L14(3.6,-1.2) L15(4.4,-1.2) L16(5.2,-1.2) L17(6,-1.2) L18(6.8,-1.2) M1(-6.8,-2) M2(-6,-2) M3(-5.2,-2) M4(-4.4,-2) M5(-3.6,-2) M6(-2.8,-2) M7(-2,-2) M8(-1.2,-2) M9(-0.4,-2) M10(0.4,-2) M11(1.2,-2) M12(2,-2) M13(2.8,-2) M14(3.6,-2) M15(4.4,-2) M16(5.2,-2) M17(6,-2) M18(6.8,-2) N1(-6.8,-2.8) N2(-6,-2.8) N3(-5.2,-2.8) N4(-4.4,-2.8) N5(-3.6,-2.8) N6(-2.8,-2.8) N7(-2,-2.8) N8(-1.2,-2.8) N9(-0.4,-2.8) N10(0.4,-2.8) N11(1.2,-2.8) N12(2,-2.8) N13(2.8,-2.8) N14(3.6,-2.8) N15(4.4,-2.8) N16(5.2,-2.8) N17(6,-2.8) N18(6.8,-2.8) P1(-6.8,-3.6) P2(-6,-3.6) P3(-5.2,-3.6) P4(-4.4,-3.6) P5(-3.6,-3.6) P6(-2.8,-3.6) P7(-2,-3.6) P8(-1.2,-3.6) P9(-0.4,-3.6) P10(0.4,-3.6) P11(1.2,-3.6) P12(2,-3.6) P13(2.8,-3.6) P14(3.6,-3.6) P15(4.4,-3.6) P16(5.2,-3.6) P17(6,-3.6) P18(6.8,-3.6) R1(-6.8,-4.4) R2(-6,-4.4) R3(-5.2,-4.4) R4(-4.4,-4.4) R5(-3.6,-4.4) R6(-2.8,-4.4) R7(-2,-4.4) R8(-1.2,-4.4) R9(-0.4,-4.4) R10(0.4,-4.4) R11(1.2,-4.4) R12(2,-4.4) R13(2.8,-4.4) R14(3.6,-4.4) R15(4.4,-4.4) R16(5.2,-4.4) R17(6,-4.4) R18(6.8,-4.4) T1(-6.8,-5.2) T2(-6,-5.2) T3(-5.2,-5.2) T4(-4.4,-5.2) T5(-3.6,-5.2) T6(-2.8,-5.2) T7(-2,-5.2) T8(-1.2,-5.2) T9(-0.4,-5.2) T10(0.4,-5.2) T11(1.2,-5.2) T12(2,-5.2) T13(2.8,-5.2) T14(3.6,-5.2) T15(4.4,-5.2) T16(5.2,-5.2) T17(6,-5.2) T18(6.8,-5.2) U1(-6.8,-6) U2(-6,-6) U3(-5.2,-6) U4(-4.4,-6) U5(-3.6,-6) U6(-2.8,-6) U7(-2,-6) U8(-1.2,-6) U9(-0.4,-6) U10(0.4,-6) U11(1.2,-6) U12(2,-6) U13(2.8,-6) U14(3.6,-6) U15(4.4,-6) U16(5.2,-6) U17(6,-6) U18(6.8,-6) V1(-6.8,-6.8) V2(-6,-6.8) V3(-5.2,-6.8) V4(-4.4,-6.8) V5(-3.6,-6.8) V6(-2.8,-6.8) V7(-2,-6.8) V8(-1.2,-6.8) V9(-0.4,-6.8) V10(0.4,-6.8) V11(1.2,-6.8) V12(2,-6.8) V13(2.8,-6.8) V14(3.6,-6.8) V15(4.4,-6.8) V16(5.2,-6.8) V17(6,-6.8) V18(6.8,-6.8)
BGA96_T9_P8_9X14
  round 0.356 smd: A1(-3.2,6.001) A2(-2.4,6.001) A3(-1.6,6.001) A7(1.6,6.001) A8(2.4,6.001) A9(3.2,6.001) B1(-3.2,5.201) B2(-2.4,5.201) B3(-1.6,5.201) B7(1.6,5.201) B8(2.4,5.201) B9(3.2,5.201) C1(-3.2,4.401) C2(-2.4,4.401) C3(-1.6,4.401) C7(1.6,4.401) C8(2.4,4.401) C9(3.2,4.401) D1(-3.2,3.6) D2(-2.4,3.6) D3(-1.6,3.6) D7(1.6,3.6) D8(2.4,3.6) D9(3.2,3.6) E1(-3.2,2.8) E2(-2.4,2.8) E3(-1.6,2.8) E7(1.6,2.8) E8(2.4,2.8) E9(3.2,2.8) F1(-3.2,2) F2(-2.4,2) F3(-1.6,2) F7(1.6,2) F8(2.4,2) F9(3.2,2) G1(-3.2,1.2) G2(-2.4,1.2) G3(-1.6,1.2) G7(1.6,1.2) G8(2.4,1.2) G9(3.2,1.2) H1(-3.2,0.4) H2(-2.4,0.4) H3(-1.6,0.4) H7(1.6,0.4) H8(2.4,0.4) H9(3.2,0.4) J1(-3.2,-0.4) J2(-2.4,-0.4) J3(-1.6,-0.4) J7(1.6,-0.4) J8(2.4,-0.4) J9(3.2,-0.4) K1(-3.2,-1.2) K2(-2.4,-1.2) K3(-1.6,-1.2) K7(1.6,-1.2) K8(2.4,-1.2) K9(3.2,-1.2) L1(-3.2,-2) L2(-2.4,-2) L3(-1.6,-2) L7(1.6,-2) L8(2.4,-2) L9(3.2,-2) M1(-3.2,-2.8) M2(-2.4,-2.8) M3(-1.6,-2.8) M7(1.6,-2.8) M8(2.4,-2.8) M9(3.2,-2.8) N1(-3.2,-3.6) N2(-2.4,-3.6) N3(-1.6,-3.6) N7(1.6,-3.6) N8(2.4,-3.6) N9(3.2,-3.6) P1(-3.2,-4.401) P2(-2.4,-4.401) P3(-1.6,-4.401) P7(1.6,-4.401) P8(2.4,-4.401) P9(3.2,-4.401) R1(-3.2,-5.201) R2(-2.4,-5.201) R3(-1.6,-5.201) R7(1.6,-5.201) R8(2.4,-5.201) R9(3.2,-5.201) T1(-3.2,-6.001) T2(-2.4,-6.001) T3(-1.6,-6.001) T7(1.6,-6.001) T8(2.4,-6.001) T9(3.2,-6.001)
BGA153_P14_P5_11P5X13
  round 0.254 smd: A1(-3.25,3.25) A2(-2.75,3.25) A3(-2.25,3.25) A4(-1.75,3.25) A5(-1.25,3.25) A6(-0.75,3.25) A7(-0.25,3.25) A8(0.25,3.25) A9(0.75,3.25) A10(1.25,3.25) A11(1.75,3.25) A12(2.25,3.25) A13(2.75,3.25) A14(3.25,3.25) B1(-3.25,2.75) B2(-2.75,2.75) B3(-2.25,2.75) B4(-1.75,2.75) B5(-1.25,2.75) B6(-0.75,2.75) B7(-0.25,2.75) B8(0.25,2.75) B9(0.75,2.75) B10(1.25,2.75) B11(1.75,2.75) B12(2.25,2.75) B13(2.75,2.75) B14(3.25,2.75) C1(-3.25,2.25) C2(-2.75,2.25) C3(-2.25,2.25) C4(-1.75,2.25) C5(-1.25,2.25) C6(-0.75,2.25) C7(-0.25,2.25) C8(0.25,2.25) C9(0.75,2.25) C10(1.25,2.25) C11(1.75,2.25) C12(2.25,2.25) C13(2.75,2.25) C14(3.25,2.25) D1(-3.25,1.75) D2(-2.75,1.75) D3(-2.25,1.75) D4(-1.75,1.75) D12(2.25,1.75) D13(2.75,1.75) D14(3.25,1.75) E1(-3.25,1.25) E2(-2.75,1.25) E3(-2.25,1.25) E5(-1.25,1.25) E6(-0.75,1.25) E7(-0.25,1.25) E8(0.25,1.25) E9(0.75,1.25) E10(1.25,1.25) E12(2.25,1.25) E13(2.75,1.25) E14(3.25,1.25) F1(-3.25,0.75) F2(-2.75,0.75) F3(-2.25,0.75) F5(-1.25,0.75) F10(1.25,0.75) F12(2.25,0.75) F13(2.75,0.75) F14(3.25,0.75) G1(-3.25,0.25) G2(-2.75,0.25) G3(-2.25,0.25) G5(-1.25,0.25) G10(1.25,0.25) G12(2.25,0.25) G13(2.75,0.25) G14(3.25,0.25) H1(-3.25,-0.25) H2(-2.75,-0.25) H3(-2.25,-0.25) H5(-1.25,-0.25) H10(1.25,-0.25) H12(2.25,-0.25) H13(2.75,-0.25) H14(3.25,-0.25) J1(-3.25,-0.75) J2(-2.75,-0.75) J3(-2.25,-0.75) J5(-1.25,-0.75) J10(1.25,-0.75) J12(2.25,-0.75) J13(2.75,-0.75) J14(3.25,-0.75) K1(-3.25,-1.25) K2(-2.75,-1.25) K3(-2.25,-1.25) K5(-1.25,-1.25) K6(-0.75,-1.25) K7(-0.25,-1.25) K8(0.25,-1.25) K9(0.75,-1.25) K10(1.25,-1.25) K12(2.25,-1.25) K13(2.75,-1.25) K14(3.25,-1.25) L1(-3.25,-1.75) L2(-2.75,-1.75) L3(-2.25,-1.75) L12(2.25,-1.75) L13(2.75,-1.75) L14(3.25,-1.75) M1(-3.25,-2.25) M2(-2.75,-2.25) M3(-2.25,-2.25) M4(-1.75,-2.25) M5(-1.25,-2.25) M6(-0.75,-2.25) M7(-0.25,-2.25) M8(0.25,-2.25) M9(0.75,-2.25) M10(1.25,-2.25) M11(1.75,-2.25) M12(2.25,-2.25) M13(2.75,-2.25) M14(3.25,-2.25) N1(-3.25,-2.75) N2(-2.75,-2.75) N3(-2.25,-2.75) N4(-1.75,-2.75) N5(-1.25,-2.75) N6(-0.75,-2.75) N7(-0.25,-2.75) N8(0.25,-2.75) N9(0.75,-2.75) N10(1.25,-2.75) N11(1.75,-2.75) N12(2.25,-2.75) N13(2.75,-2.75) N14(3.25,-2.75) P1(-3.25,-3.25) P2(-2.75,-3.25) P3(-2.25,-3.25) P4(-1.75,-3.25) P5(-1.25,-3.25) P6(-0.75,-3.25) P7(-0.25,-3.25) P8(0.25,-3.25) P9(0.75,-3.25) P10(1.25,-3.25) P11(1.75,-3.25) P12(2.25,-3.25) P13(2.75,-3.25) P14(3.25,-3.25)
CONN3-PWR-PJ102A
  oval 1.778x4.572 hole 1.016x3.556: 1(0,0)
  oval 1.778x3.81 hole 1.016x3.048: 2(5.994,0)
  oval 3.81x1.778 hole 3.048x1.016: 3(2.997,4.699)
CONN19_HDMI
  rect 0.23x0.951 smd: 1(1.8,4.841) 3(1.4,4.841) 5(1,4.841) 7(0.6,4.841) 9(0.2,4.841) 11(-0.2,4.841) 13(-0.6,4.841) 15(-1,4.841) 17(-1.4,4.841) 19(-1.8,4.841)
  rect 0.23x1 smd: 2(1.6,3.54) 4(1.2,3.54) 6(0.8,3.54) 8(0.4,3.54) 10(0,3.54) 12(-0.4,3.54) 14(-0.8,3.54) 16(-1.2,3.54) 18(-1.6,3.54)
  oval 1.651x2.54 hole 0.381x1.27: 20(3.1,0) 21(-3.1,0)
  rect 2.413x1.524 smd: 22(3.45,3.36) 23(-3.45,3.36)
DCK5_2P15X1P4
  rect 0.4x0.9 smd: 1(-0.65,-1.1) 2(0,-1.1) 3(0.65,-1.1) 4(0.65,1.1) 5(-0.65,1.1)
DGN-16X60
  oval 0.406x1.524 smd: 1(-0.975,-2.311) 2(-0.325,-2.311) 3(0.325,-2.311) 4(0.975,-2.311) 5(0.975,2.311) 6(0.325,2.311) 7(-0.325,2.311) 8(-0.975,2.311)
  rect 2.032x2.032 smd: 9(0,0)
HEADER10X2_SMD
  rect 0.711x2.794 smd: 1(-5.715,-2.705) 2(-5.715,2.705) 3(-4.445,-2.705) 4(-4.445,2.705) 5(-3.175,-2.705) 6(-3.175,2.705) 7(-1.905,-2.705) 8(-1.905,2.705) 9(-0.635,-2.705) 10(-0.635,2.705) 11(0.635,-2.705) 12(0.635,2.705) 13(1.905,-2.705) 14(1.905,2.705) 15(3.175,-2.705) 16(3.175,2.705) 17(4.445,-2.705) 18(4.445,2.705) 19(5.715,-2.705) 20(5.715,2.705)
HEADER23X2
  rect 1.524x1.524 hole 0.889: 1(0,0)
  round 1.524 hole 0.889: 2(0,2.54) 3(2.54,0) 4(2.54,2.54) 5(5.08,0) 6(5.08,2.54) 7(7.62,0) 8(7.62,2.54) 9(10.16,0) 10(10.16,2.54) 11(12.7,0) 12(12.7,2.54) 13(15.24,0) 14(15.24,2.54) 15(17.78,0) 16(17.78,2.54) 17(20.32,0) 18(20.32,2.54) 19(22.86,0) 20(22.86,2.54) 21(25.4,0) 22(25.4,2.54) 23(27.94,0) 24(27.94,2.54) 25(30.48,0) 26(30.48,2.54) 27(33.02,0) 28(33.02,2.54) 29(35.56,0) 30(35.56,2.54) 31(38.1,0) 32(38.1,2.54) 33(40.64,0) 34(40.64,2.54) 35(43.18,0) 36(43.18,2.54) 37(45.72,0) 38(45.72,2.54) 39(48.26,0) 40(48.26,2.54) 41(50.8,0) 42(50.8,2.54) 43(53.34,0) 44(53.34,2.54) 45(55.88,0) 46(55.88,2.54)
LED_0603
  rect 0.762x1.016 smd: 1(-0.826,0) 2(0.826,0)
MICRO_SD_15X14_3X1_8MM
  rrect 0.6x1.88 smd: 1(8.8,-0.01) 2(7.7,-0.01) 3(6.6,-0.01) 4(5.5,-0.01) 5(4.4,-0.01) 6(3.3,-0.01) 7(2.2,-0.01) 8(1.1,-0.01)
  rrect 1.3x1.3 smd: 9(-0.85,1.58)
  rrect 1.3x1.4 smd: 10(-0.85,8.98)
  rrect 1.7x1.5 smd: S1(12.45,0)
  rrect 1.6x1.5 smd: S2(-0.325,0)
  rrect 1.5x1.7 smd: S3(-0.75,14.78) S4(12.75,14.78)
MTGH200C125D_PL
  round 4.445 hole 3.175: 1(0,0)
OSC4_61X65LS_79X98SMD
  rect 0.711x0.889 smd: 1(-0.826,-0.775) 2(0.826,-0.775) 3(0.826,0.775) 4(-0.826,0.775)
POLYSW200-5638-310
  round 1.651 hole 1.016: 1(-5.08,2.54) 2(0,0)
QFN32_5X5MM_EP3P3MM
  oval 0.254x0.838 smd: 1(-1.751,-2.515) 8(1.751,-2.515) 17(1.751,2.515) 24(-1.751,2.515)
  rect 0.254x0.838 smd: 2(-1.251,-2.515) 3(-0.751,-2.515) 4(-0.25,-2.515) 5(0.25,-2.515) 6(0.751,-2.515) 7(1.251,-2.515) 18(1.251,2.515) 19(0.751,2.515) 20(0.25,2.515) 21(-0.25,2.515) 22(-0.751,2.515) 23(-1.251,2.515)
  oval 0.838x0.254 smd: 9(2.515,-1.751) 16(2.515,1.751) 25(-2.515,1.751) 32(-2.515,-1.751)
  rect 0.838x0.254 smd: 10(2.515,-1.251) 11(2.515,-0.751) 12(2.515,-0.25) 13(2.515,0.25) 14(2.515,0.751) 15(2.515,1.251) 26(-2.515,1.251) 27(-2.515,0.751) 28(-2.515,0.25) 29(-2.515,-0.25) 30(-2.515,-0.751) 31(-2.515,-1.251)
  rect 3.404x3.404 smd: 33(0,0)
QFN64S9X9P5
  rect 0.6x0.25 smd: 1(-4.35,3.75) 2(-4.35,3.25) 3(-4.35,2.75) 4(-4.35,2.25) 5(-4.35,1.75) 6(-4.35,1.25) 7(-4.35,0.75) 8(-4.35,0.25) 9(-4.35,-0.25) 10(-4.35,-0.75) 11(-4.35,-1.25) 12(-4.35,-1.75) 13(-4.35,-2.25) 14(-4.35,-2.75) 15(-4.35,-3.25) 16(-4.35,-3.75) 33(4.35,-3.75) 34(4.35,-3.25) 35(4.35,-2.75) 36(4.35,-2.25) 37(4.35,-1.75) 38(4.35,-1.25) 39(4.35,-0.75) 40(4.35,-0.25) 41(4.35,0.25) 42(4.35,0.75) 43(4.35,1.25) 44(4.35,1.75) 45(4.35,2.25) 46(4.35,2.75) 47(4.35,3.25) 48(4.35,3.75)
  rect 0.25x0.6 smd: 17(-3.75,-4.35) 18(-3.25,-4.35) 19(-2.75,-4.35) 20(-2.25,-4.35) 21(-1.75,-4.35) 22(-1.25,-4.35) 23(-0.75,-4.35) 24(-0.25,-4.35) 25(0.25,-4.35) 26(0.75,-4.35) 27(1.25,-4.35) 28(1.75,-4.35) 29(2.25,-4.35) 30(2.75,-4.35) 31(3.25,-4.35) 32(3.75,-4.35) 49(3.75,4.35) 50(3.25,4.35) 51(2.75,4.35) 52(2.25,4.35) 53(1.75,4.35) 54(1.25,4.35) 55(0.75,4.35) 56(0.25,4.35) 57(-0.25,4.35) 58(-0.75,4.35) 59(-1.25,4.35) 60(-1.75,4.35) 61(-2.25,4.35) 62(-2.75,4.35) 63(-3.25,4.35) 64(-3.75,4.35)
  rect 5.08x5.08 smd: 65(0,0)
RD205SMD_250D
  rect 3.048x1.651 smd: 1(-2.603,0) 2(2.603,0)
RJ45-7499010211A
  round 1.016 hole 3.251 unplated: (-1.27,-6.35) (10.16,-6.35)
  rect 1.524x1.524 hole 1.016: 1(0,0)
  round 1.524 hole 1.016: 2(1.27,2.54) 3(2.54,0) 4(3.81,2.54) 5(5.08,0) 6(6.35,2.54) 7(7.62,0) 8(8.89,2.54) 9(-1.88,-11.252) 10(0.66,-9.728) 11(8.23,-11.252) 12(10.77,-9.728)
  round 2.286 hole 1.6: 13(-3.429,-3.302) 14(12.319,-3.302)
SIP6
  rect 1.524x1.524 hole 1.016: 1(0,0)
  round 1.524 hole 1.016: 2(0,-2.54) 3(0,-5.08) 4(0,-7.62) 5(0,-10.16) 6(0,-12.7)
SM-7351-IND-0805
  rect 1.397x1.549 smd: 1(-0.95,0) 2(0.95,0)
SMINI6-F3-B
  rect 0.305x0.95 smd: 1(0.65,0.75) 2(0,0.75) 3(-0.65,0.75) 4(-0.65,-0.75) 5(0,-0.75) 6(0.65,-0.75)
SO8-25X75
  oval 0.635x1.905 smd: 1(-1.905,-2.794) 2(-0.635,-2.794) 3(0.635,-2.794) 4(1.905,-2.794) 5(1.905,2.794) 6(0.635,2.794) 7(-0.635,2.794) 8(-1.905,2.794)
SOD323
  rect 0.8x0.8 smd: 1(1.125,0) 2(-1.125,0)
SOP8_DCT
  rect 0.305x1.6 smd: 1(-0.975,-1.702) 2(-0.325,-1.702) 3(0.325,-1.702) 4(0.975,-1.702) 5(0.975,1.702) 6(0.325,1.702) 7(-0.325,1.702) 8(-0.975,1.702)
SOT23-5
  rect 0.635x1.016 smd: 1(-0.953,-1.295) 2(0,-1.295) 3(0.953,-1.295) 4(0.953,1.295) 5(-0.953,1.295)
SW4SMD_63X161LS
  rect 0.889x1.016 smd: 1(-2.05,-0.8) 2(-2.05,0.8) 3(2.05,-0.8) 4(2.05,0.8)
TP1-8040
  round 1.524 hole 1.016: 1(0,0)
TP60C33D
  round 1.524 hole 0.889: 1(0,0)
TP60C_SMD
  round 1.27 smd: 1(0,0)
TSSOP10
  rect 0.305x1.905 smd: 1(-1,-1.981)
  rect 0.305x1.651 smd: 2(-0.5,-2.108) 3(0,-2.108) 4(0.5,-2.108) 5(1,-2.108) 6(1,2.108) 7(0.5,2.108) 8(0,2.108) 9(-0.5,2.108) 10(-1,2.108)
U_6_DRY
  rect 0.305x0.508 smd: 1(-0.5,-0.439) 2(0,-0.439) 3(0.5,-0.439) 4(0.5,0.439) 5(0,0.439) 6(-0.5,0.439)
U_8_DCU
  rect 0.254x1.27 smd: 1(-0.749,-1.473) 2(-0.249,-1.473) 3(0.249,-1.473) 4(0.749,-1.473) 5(0.749,1.473) 6(0.249,1.473) 7(-0.249,1.473) 8(-0.749,1.473)
U_48_RSL
  rect 0.8x0.2 smd: 1(-3.075,2.2) 2(-3.075,1.8) 3(-3.075,1.4) 4(-3.075,1) 5(-3.075,0.6) 6(-3.075,0.2) 7(-3.075,-0.2) 8(-3.075,-0.6) 9(-3.075,-1) 10(-3.075,-1.4) 11(-3.075,-1.8) 12(-3.075,-2.2) 25(3.075,-2.2) 26(3.075,-1.8) 27(3.075,-1.4) 28(3.075,-1) 29(3.075,-0.6) 30(3.075,-0.2) 31(3.075,0.2) 32(3.075,0.6) 33(3.075,1) 34(3.075,1.4) 35(3.075,1.8) 36(3.075,2.2)
  rect 0.2x0.8 smd: 13(-2.2,-3.075) 14(-1.8,-3.075) 15(-1.4,-3.075) 16(-1,-3.075) 17(-0.6,-3.075) 18(-0.2,-3.075) 19(0.2,-3.075) 20(0.6,-3.075) 21(1,-3.075) 22(1.4,-3.075) 23(1.8,-3.075) 24(2.2,-3.075) 37(2.2,3.075) 38(1.8,3.075) 39(1.4,3.075) 40(1,3.075) 41(0.6,3.075) 42(0.2,3.075) 43(-0.2,3.075) 44(-0.6,3.075) 45(-1,3.075) 46(-1.4,3.075) 47(-1.8,3.075) 48(-2.2,3.075)
  rect 4.05x4.05 smd: 49(-0.225,0.225)
unnamed#2
  round 1.016 smd: 1(0,0)
USB5MINI_4SHIELDED_SMD-5
  rect 1.4x0.5 smd: 1(0,1.6) 2(0,0.8) 3(0,0) 4(0,-0.8) 5(0,-1.6)
  rect 3.81x2.54 smd: 6(-2.4,4.2) 7(-2.4,-4.2)
  rect 0.8x2.35 smd: 8(-5.2,2.675) 9(-5.2,-2.675)
USB_A_SH
  round 1.651 hole 1.016: 1(0,0) 2(2.499,0) 3(4.501,0) 4(7,0)
  oval 2.032x3.429 hole 1.016x2.413: 5(-3.071,-2.71) 6(10.071,-2.71)
XTAL4_126-216SMD
  rect 1.27x1.905 smd: 1(-2.748,-1.6) 2(2.751,-1.6) 3(2.751,1.6) 4(-2.748,1.6)
XTAL150SMD_125X196
  rect 1.778x2.159 smd: 1(-1.9,0) 2(1.9,0)

## Nets
DGND: C1.1 C2.1 C3.1 C4.1 C5.2 C7.1 C8.1 C9.1 C10.1 C11.1 C12.1 C13.1 C14.1 C15.1 C16.2 C17.2 C18.2 C19.2 C20.2 C23.2 C24.2 C27.2 C28.2 C29.2 C30.2 C34.2 C35.2 C36.2 C37.2 C38.2 C39.1 C40.1 C41.2 C42.2 C43.2 C44.2 C45.2 C46.2 C47.2 C48.2 C49.2 C50.2 C51.2 C52.2 C53.2 C54.2 C55.1 C56.1 C57.1 C58.2 C59.2 C60.1 C61.1 C62.1 C63.2 C64.2 C65.2 C66.2 C67.2 C68.1 C69.1 C70.1 C71.1 C72.1 C73.1 C74.1 C75.1 C76.1 C77.2 C78.2 C79.2 C80.2 C81.2 C82.2 C83.2 C84.2 C85.2 C86.2 C87.2 C88.2 C89.2 C90.2 C91.2 C92.2 C94.2 C95.1 C96.1 C97.2 C98.2 C99.2 C100.2 C101.2 C102.2 C103.2 C104.2 C105.2 C106.2 C107.2 C108.2 C109.2 C110.2 C111.2 C112.2 C113.2 C114.2 C115.2 C116.2 C117.2 C118.1 C119.2 C120.2 C121.2 C122.1 C123.2 C124.2 C125.2 C126.1 C127.2 C128.2 C129.2 C130.2 C131.2 C132.2 C133.1 C134.2 C135.2 C136.2 C137.2 C138.2 C139.2 C140.2 C141.2 C142.2 C143.2 C144.2 C145.2 C146.2 C147.2 C148.2 C149.2 C150.2 C151.2 C152.2 C153.2 C154.2 C155.1 C156.2 C157.2 C158.2 C159.2 C160.2 C161.2 C162.2 C163.2 C164.2 C165.2 C166.2 C167.2 C168.2 C169.2 C170.2 C171.2 C172.2 C173.2 C174.2 C175.2 D6.3 D6.8 D7.3 D7.8 FB3.2 J1.1 P1.2 P2.4 P2.8 P2.10 P2.12 P2.16 P2.20 P3.4 P4.5 P5.8 P6.4 P6.7 P6.10 P6.13 P6.16 P8.1 P8.2 P9.1 P9.2 P9.43 P9.44 P9.45 P9.46 P10.6(VSS) P10.9 Q1.1 Q1.4 Q2.1 Q2.4 R10.2 R12.1 R22.1 R25.2 R29.2 R49.1 R53.2 R54.1 R76.2 R77.2 R78.2 R79.2 R80.2 R81.2 R82.2 R83.2 R84.2 R85.2 R86.2 R87.2 R88.2 R89.2 R90.2 R91.2 R92.2 R93.2 R94.2 R95.2 R96.1 R99.1 R100.2 R115.2 R116.2 R117.2 R118.2 R130.1 R132.1 R135.2 R136.1 R144.2 R145.2 R148.2 R149.2 R164.2 R165.2 S1.1 S1.3 S2.2 S2.4(B2) S3.1 S3.3 TP1.1(TP) TP8.1(TP) U1.3 U2.30 U2.41 U2.49 U3.3 U4.5 U4.6 U4.7 U4.8 U5.A1 U5.A18 U5.F8 U5.G8 U5.G9 U5.G11 U5.G12 U5.H6 U5.H7 U5.H8 U5.H9 U5.H10 U5.H12 U5.J6 U5.J7 U5.J8 U5.J9 U5.J10 U5.J11 U5.K7 U5.K9 U5.K10 U5.K11 U5.L10 U5.L11 U5.L12 U5.L13 U5.M6 U5.M7 U5.M8 U5.M9 U5.M10 U5.M12 U5.M14(VSSA_USB2) U5.N7 U5.N10 U5.N11 U5.N14 U5.V1 U5.V18 U6.4 U7.2 U8.1 U8.9(PAD) U9.4 U10.4 U11.8 U11.9 U11.16 U11.17 U11.18 U11.19 U11.53 U11.54 U11.61 U11.62 U11.63 U11.65 U12.A9 U12.B1 U12.B3 U12.B9 U12.D1 U12.D8 U12.E1 U12.E2 U12.E8 U12.F9 U12.G1 U12.G8 U12.G9 U12.J2 U12.J8 U12.M1 U12.M9 U12.P1 U12.P9 U12.T1 U12.T9 U13.A6 U13.C4(VSSQ4) U13.E7 U13.G5 U13.H10 U13.J5 U13.K8 U13.N2 U13.N5 U13.P4 U13.P6 U14.33 U15.1 U15.4 U16.3 Y4.2
GND_EARTH: MTG1.1(TP) MTG2.1(TP) MTG3.1(TP) MTG4.1(TP) P3.5(SHELD1) P3.6 P4.6 P4.7 P4.8 P4.9 P5.13 P5.14 P6.20 P6.21 P6.22 P6.23 P10.S1 P10.S3 P10.S4 R136.2
GND_OSC0: C25.2 C26.2 R29.1 R30.1 U5.V11
GND_OSC1: C21.1 C22.1 R30.2 U5.A5
GNDA_ADC: C31.2 C32.2 C33.2 C93.2 FB3.1 P9.34 U5.A9 U5.E8
VBUS: FB7.2 P3.1
VDD_1V8: C14.2 C78.1 C86.1 C88.1 FB1.1 FB2.2 FB5.2 R9.2 U2.40 U5.D10 U5.E9 U5.N16 U5.R16
VDD_3V3A: C15.2 C27.1 C37.1 C38.1 C56.2 C57.2 C58.1 C59.1 C60.2 C61.2 C66.1 C67.1 C68.2 C69.2 C70.2 C71.2 C72.2 C73.2 C74.2 C75.2 C76.2 C77.1 C87.1 C152.1 C158.1 C159.1 R1.1 R3.1 R4.1 R14.1 R52.1 R55.1 R56.1 R57.1 R58.1 R59.1 R60.1 R61.1 R62.1 R63.1 R64.1 R65.1 R66.1 R67.1 R68.1 R69.1 R70.1 R156.1 U2.43 U3.5 U4.1 U5.E10 U5.E11 U5.E12 U5.E13 U5.F14 U5.G14 U5.H14 U5.J14 U5.K14 U5.L14 U5.N5 U5.N15 U5.P5 U5.P6 U5.P7 U5.P8 U5.P10 U5.P11 U5.P12 U5.P13 U5.R15 U6.6 U6.7 U6.8(VCC) U7.4 Y4.4(VCC)
VDD_3V3AUX: C18.1 D1.2 U2.1
VDD_3V3B: C20.1 C23.1 C29.1 C126.2 C127.1 C128.1 C129.1 C130.1 C135.1 C153.1 C154.1 C155.2 FB4.1 P2.5(TVDD) P9.3 P9.4 P10.4 R11.1 R23.1 R24.1 R33.1 R34.1 R101.1 R102.1 R103.1 R104.1 R105.1 R106.1 R107.1 R108.1 R109.1 R110.1 R111.1 R112.2 R113.2 R114.2 R119.1 R150.1 R151.1 R152.1 R153.1 R154.1 R155.1 R157.2 R158.1 R163.1 R166.2 U1.5 U4.3(OUT) U13.C6 U13.E6 U13.F5 U13.J10 U13.K9 U13.M4 U13.N4 U13.P3 U13.P5 U14.12 U15.7 U15.8(VCC)
VDD_5V: C2.2 P1.1 P9.5 P9.6 U2.10
VDD_ADC: C93.1 FB2.1 P9.32 R27.1 U5.D8
VDD_CORE: C11.2 C39.2 C40.2 C41.1 C42.1 C43.1 C44.1 C45.1 C46.1 C47.1 C48.1 C49.1 C50.1 C51.1 C52.1 C53.1 C54.1 C55.2 L3.2 U2.29 U5.F6 U5.F7 U5.G6 U5.G7 U5.G10 U5.H11 U5.J12 U5.K6 U5.K8 U5.K12 U5.L6 U5.L7 U5.L8 U5.L9 U5.M11 U5.M13 U5.N8 U5.N9 U5.N12 U5.N13
VDD_MPU: C12.2 C62.2 C63.1 C64.1 C65.1 L2.2 U2.24 U5.F10 U5.F11 U5.F12 U5.F13 U5.G13 U5.H13 U5.J13
VDD_MPUON: TP2.1(TP) U5.A2
VDD_PHYA: C131.1 C132.1 C133.2 FB4.2 R120.2 R121.2 R122.2 R123.2 R137.2 U14.1 U14.27
VDD_PLL: C79.1 C92.1 C94.1 C106.1 FB1.2 U5.E7 U5.H15 U5.R10 U5.R11
VDD_RTC: C104.1 U5.D6
VDDS: C80.1 C81.1 C82.1 C83.1 C84.1 C85.1 R8.2 R9.1 U5.E6 U5.E14 U5.F9 U5.K13 U5.N6 U5.P9 U5.P14
VDDS_DDR: C9.2 C95.2 C96.2 C97.1 C98.1 C99.1 C100.1 C101.1 C102.1 C103.1 C107.1 C108.1 C109.1 C110.1 C111.1 C112.1 C113.1 C114.1 C115.1 C116.1 C117.1 C118.2 C119.1 C120.1 C121.1 C122.2 R6.2 R97.1 R98.1 U5.E5 U5.F5 U5.G5 U5.H5 U5.J5 U5.K5 U5.L5 U12.A1 U12.A8 U12.B2 U12.C1 U12.C9 U12.D2 U12.D9 U12.E9 U12.F1 U12.G7 U12.H2 U12.H9 U12.K2 U12.K8 U12.N1 U12.N9 U12.R1 U12.R9
12M_LOOP: U6.2 U6.3
12MHZ: R21.2 U11.27
AIN0: P9.39 U5.B6
AIN1: P9.40 U5.C7
AIN2: P9.37 U5.B7
AIN3: P9.38 U5.A7
AIN4: P9.33 U5.C8
AIN5: P9.36 U5.B8
AIN6: P9.35 U5.A8
AIN7: R163.2 R164.1 U5.C9
AM3_MMC1_CLK: R35.1 U5.U9
AM3_MMC1_CMD: R36.1 U5.V9
AM3_MMC1_DAT0: R43.1 U5.U7
AM3_MMC1_DAT1: R44.1 U5.V7
AM3_MMC1_DAT2: R168.1 U5.R8
AM3_MMC1_DAT3: R169.1 U5.T8
AM3_MMC1_DAT4: R170.1 U5.U8
AM3_MMC1_DAT5: R171.1 U5.V8
AM3_MMC1_DAT6: R172.1 U5.R9
AM3_MMC1_DAT7: R173.1 U5.T9
B_UART0_RX: J1.4 R165.1 U15.2
B_UART0_TX: J1.5 U15.3
CAP_VBB_MPU: C91.1 U5.C10
CAP_VDD_SRAM_CORE: C89.1 U5.D9
CAP_VDD_SRAM_MPU: C90.1 U5.D11
CLKOUT2: P2.18 P9.41 R19.2 R20.1
CLKOUT_SRC: R19.1 U5.D14
CRS: R139.2 U14.14
DDR_A0: U5.F3 U12.N3
DDR_A1: U5.H1 U12.P7
DDR_A2: U5.E4 U12.P3
DDR_A3: U5.C3 U12.N2
DDR_A4: U5.C2 U12.P8
DDR_A5: U5.B1 U12.P2
DDR_A6: U5.D5 U12.R8
DDR_A7: U5.E2 U12.R2
DDR_A8: U5.D4 U12.T8
DDR_A9: U5.C1 U12.R3
DDR_A10: U5.F4 U12.L7
DDR_A11: U5.F2 U12.R7
DDR_A12: U5.E3 U12.N7
DDR_A13: U5.H3 U12.T3
DDR_A14: U5.H4 U12.T7
DDR_A15: U5.D3 U12.M7
DDR_BA0: U5.C4 U12.M2
DDR_BA1: U5.E1 U12.N8
DDR_BA2: U5.B3 U12.M3
DDR_CASN: U5.F1 U12.K3
DDR_CKE: R96.2 U5.G3 U12.K9
DDR_CLK: U5.D2 U12.J7
DDR_CLKN: U5.D1 U12.K7
DDR_CSN: U5.H2 U12.L2
DDR_D0: U5.M3 U12.E3
DDR_D1: U5.M4 U12.F7
DDR_D2: U5.N1 U12.F2
DDR_D3: U5.N2 U12.F8
DDR_D4: U5.N3 U12.H3
DDR_D5: U5.N4 U12.H8
DDR_D6: U5.P3 U12.G2
DDR_D7: U5.P4 U12.H7
DDR_D8: U5.J1 U12.D7
DDR_D9: U5.K1 U12.C3
DDR_D10: U5.K2 U12.C8
DDR_D11: U5.K3 U12.C2
DDR_D12: U5.K4 U12.A7
DDR_D13: U5.L3 U12.A2
DDR_D14: U5.L4 U12.B8
DDR_D15: U5.M1 U12.A3
DDR_DQM0: U5.M2 U12.E7
DDR_DQM1: U5.J2 U12.D3
DDR_DQS0: U5.P1 U12.F3
DDR_DQS1: U5.L1 U12.C7
DDR_DQSN0: U5.P2 U12.G3
DDR_DQSN1: U5.L2 U12.B7
DDR_ODT: U5.G1 U12.K1
DDR_RASN: U5.G4 U12.J3
DDR_RESETN: R97.2 U5.G2 U12.T2
DDR_VREF: C28.1 C123.1 C124.1 R98.2 R100.1 U5.J4 U12.H1 U12.M8
DDR_VTP: R22.2 U5.J3
DDR_WEN: U5.B2 U12.L3
DVI_+5V: P6.19 R146.1 R147.1 RT1.2
EHRPWM1A: P9.14 U5.U14
EHRPWM1B: P9.16 U5.T14
EHRPWM2A: P8.19 U5.U10
EHRPWM2B: P8.13 U5.T10
EMMC_RSTN: R111.2 R162.2 U13.K5
EMMC_VCCI: C125.1 U13.C2
ENZ_KALDO_1P8V: R54.2 U5.B4
ETH_RESETN: C174.1 R33.2 U1.4(Y) U14.19
ETH_RST_GPIO1_8: R34.2 U1.1 U5.E18
ETH_TXD4: R145.1 U14.18
GPIO0_7: P9.42 R50.1 R51.1
GPIO0_7SRC: R50.2 U5.C18
GPIO0_26: P8.14 U5.T11
GPIO0_27: P8.17(9) U5.U12
GPIO1_12: P8.12 U5.T12
GPIO1_13: P8.11 U5.R12
GPIO1_14: P8.16 U5.V13
GPIO1_15: P8.15 U5.U13
GPIO1_16: P9.15 R160.2 R161.2
GPIO1_17: P9.23 U5.V14
GPIO1_28: P9.12 U5.U18
GPIO1_29: P8.26 U5.V6
GPIO2_1: P8.18 U5.V12
GPIO3_18: R51.2 U5.B12
GPIO3_19: P9.27 U5.C13
GPIO3_20: R20.2 U5.D13
GPIO3_21: P9.25 R167.2 U5.A14
GRN_C: P5.10 R132.2
GRNA: P5.9 U14.3
HDMI_1V8: C144.1 C145.1 C146.1 C147.1 C148.1 C149.1 C150.1 C151.1 FB5.1 U11.5 U11.14 U11.29 U11.35 U11.36 U11.41 U11.46 U11.47 U11.48 U11.55
HDMI_CEC: D8.1(CATHODE) P6.15 U11.30
HDMI_CEC_D: D8.2 R166.1
HDMI_DSCL: P6.17 R146.2 U11.33
HDMI_DSDA: P6.18(SDA) R147.2 U11.32
HDMI_HPD: P6.1 U11.31
HDMI_INT: R158.2 U5.U16 U11.50
HDMI_SWING: R148.1 U11.34
HDMI_TX0+: D6.2 P6.9 U11.40
HDMI_TX0-: D6.1 P6.11 U11.39
HDMI_TX1+: D7.5 P6.6 U11.43
HDMI_TX1-: D7.4 P6.8 U11.42
HDMI_TX2+: D7.2 P6.3 U11.45
HDMI_TX2-: D7.1 P6.5 U11.44
HDMI_TXC+: D6.4 P6.12 U11.38
HDMI_TXC-: D6.5 P6.14 U11.37
HDMICLK_DISN: U5.V17 Y4.1
I2C0_SCL: R3.2 U2.28 U5.C16 U7.1 U11.52
I2C0_SDA: R4.2 U2.27 U5.C17 U7.3 U11.51
I2C1_SCL: P9.17(9) U5.A16
I2C1_SDA: P9.18 U5.B16
I2C2_SCL: P9.19 U5.D17
I2C2_SDA: P9.20 U5.D18
JTAG_EMU0: P2.13 R23.2 U5.C14
JTAG_EMU1: P2.14 R24.2 U5.B14
JTAG_TCK: P2.9 P2.11 U5.A12
JTAG_TDI: P2.3 U5.B11
JTAG_TDO: P2.7 U5.A11
JTAG_TMS: P2.1 U5.C11
JTAG_TRSTN: P2.2 R25.1 U5.B10
LCD_DATA0: C173.1 P8.45 R70.2 R95.1 U5.R1 U11.15
LCD_DATA1: C171.1 P8.46 R69.2 R94.1 U5.R2 U11.13
LCD_DATA2: C172.1 P8.43 R68.2 R75.1 R93.1 U5.R3 U11.12
LCD_DATA3: C170.1 P8.44 R67.2 R92.1 U5.R4 U11.11
LCD_DATA4: C169.1 P8.41 R66.2 R91.1 U5.T1 U11.10
LCD_DATA5: C163.1 P8.42 R65.2 R90.1 U5.T2 U11.7
LCD_DATA6: C162.1 P8.39 R64.2 R89.1 U5.T3 U11.6
LCD_DATA7: C161.1 P8.40 R63.2 R88.1 U5.T4 U11.3
LCD_DATA8: C160.1 P8.37 R62.2 R87.1 U5.U1 U11.2
LCD_DATA9: C157.1 P8.38 R61.2 R86.1 U5.U2 U11.1
LCD_DATA10: C156.1 P8.36 R60.2 R85.1 U5.U3 U11.64
LCD_DATA11: C168.1 P8.34 R59.2 R84.1 U5.U4 U11.60
LCD_DATA12: C167.1 P8.35 R58.2 R83.1 U5.V2 U11.59
LCD_DATA13: C166.1 P8.33 R57.2 R82.1 U5.V3 U11.58
LCD_DATA14: C165.1 P8.31 R56.2 R81.1 U5.V4 U11.57
LCD_DATA15: C164.1 P8.32 R55.2 R80.1 U5.T5 U11.56
LCD_DE: P8.30 R48.2 U11.20
LCD_HSYNC: P8.29 R47.2 U11.22
LCD_PCLK: P8.28 R45.2 U11.4
LCD_VSYNC: P8.27 R46.2 U11.21(VSYNC/VREF)
LCDDE: R48.1 U5.R6
LCDPCLK: R45.1 U5.V5
LCDVHYNC: R47.1 U5.R5
LCDVSYNC: R46.1 U5.U5
LDO_PGOOD: U2.46 U5.B5
LEDAA: D2.2 R72.2
LEDAC: D2.1(C) Q1.6
LEDBA: D3.2 R73.2
LEDBC: D3.1(C) Q1.3
LEDCA: D4.2 R74.2
LEDCC: D4.1(C) Q2.6
LEDDA: D5.2 R71.2
LEDDC: D5.1(C) Q2.3
MDIO_CLK: U5.M18 U14.17
MDIO_DATA: R119.2 U5.M17 U14.16
MII1_COL: R138.1 U5.H16
MII1_CRS_DV: R139.1 U5.H17
MII1_REFCLK: R28.2 R124.1 R140.1
MII1_RXCLK: R131.1 U5.L18
MII1_RXD0: R128.1 U5.M16
MII1_RXD1: R127.1 U5.L15
